# Altium PCB TYPE-C 16PIN 2MD(073).pcbdoc
Units mm, origin at the board's own origin, x right, y up, seen from the top; angles counter-clockwise.
Board outline 22.65 x 20.63 mm, 2 copper layers (Top Layer, Bottom Layer), stack 0.07 mm thick; 1 components, 0 nets, 16 pads, 0 vias.
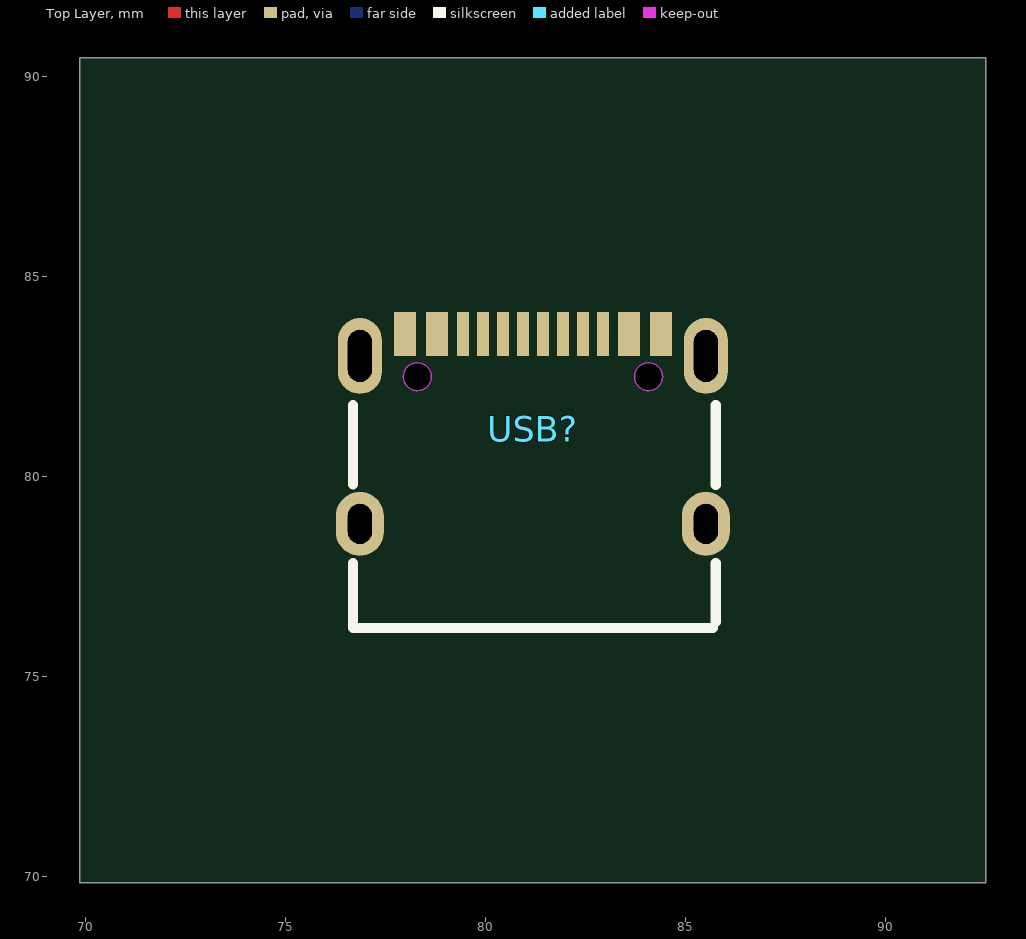
[diagram p0: Top Layer view]
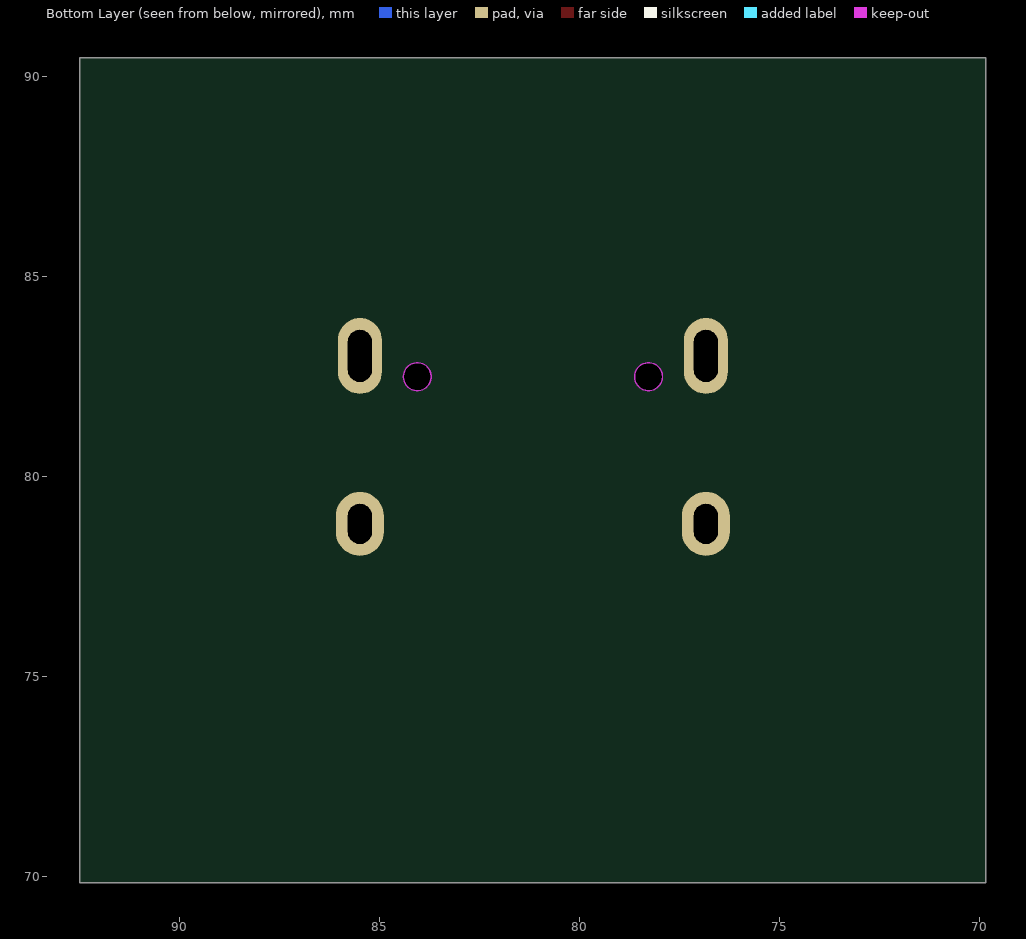
[diagram p1: Bottom Layer view, seen from below]

## Layer stack, top to bottom
Top Solder Mask Layer: solder mask 0.01, Dk 3.3
Top Layer: signal copper 0.035
Bottom Layer: signal copper 0.035
Bottom Solder Mask Layer: solder mask 0.01, Dk 3.3

## Board outline
92.5,69.85 69.85,69.85 69.85,90.476 92.5,90.476

## Components (designator, comment, footprint, x,y, rotation, side; value= is the part's Value field where it differs from the comment)
USB? "TYPE-C 16PIN 2MD(073)" USB-C-SMD_TYPE-C-16PIN-2MD-073 81.175,81.201 r0 top

## Footprints (in the part's own frame and the unit in brackets; to place one, negate y for a bottom-side part, rotate by r counter-clockwise, add the part's x,y. Pads: shape width x height; smd on the part's side, far side on the other; paste and mask are expansions set on the pad)
USB-C-SMD_TYPE-C-16PIN-2MD-073 [mm]
  oval 1.2x1.6 hole 0.6 slot 1 at 90 deg paste+0 mask+0.05: 13(-4.325,-2.375) 14(4.325,-2.375)
  oval 1.1x1.9 hole 0.6 slot 1.3 at 90 deg paste+0 mask+0.05: 13(-4.325,1.825) 14(4.325,1.825)
  rect 0.55x1.1 smd paste+0 mask+0.05: A1B12(-3.2,2.375) A4B9(-2.4,2.375) B1A12(3.2,2.375) B4A9(2.4,2.375)
  rect 0.3x1.1 smd paste+0 mask+0.05: A5(-1.25,2.375) A6(-0.25,2.375) A7(0.25,2.375) A8(1.25,2.375) B5(1.75,2.375) B6(0.75,2.375) B7(-0.75,2.375) B8(-1.75,2.375)
  Board Outline Layer circle w0.003: c-2.89,1.305 r0.35
  Board Outline Layer circle w0.003: c2.89,1.305 r0.35
  Board Outline Layer region: -2.54,1.305 -2.575,1.153 -2.672,1.031 -2.812,0.964 -2.968,0.964 -3.108,1.031 -3.205,1.153 -3.24,1.305 -3.24,1.305 -3.205,1.457 -3.108,1.579 -2.968,1.646 -2.812,1.646 -2.672,1.579 -2.575,1.457 -2.54,1.305
  Board Outline Layer region: -2.54,1.305 -2.549,1.227 -2.575,1.153 -2.616,1.087 -2.672,1.031 -2.738,0.99 -2.812,0.964 -2.89,0.955 -2.968,0.964 -3.042,0.99 -3.108,1.031 -3.164,1.087 -3.205,1.153 -3.231,1.227 -3.24,1.305 -3.231,1.383 -3.205,1.457 -3.164,1.523 -3.108,1.579 -3.042,1.62 -2.968,1.646 -2.89,1.655 -2.812,1.646 -2.738,1.62 -2.672,1.579 -2.616,1.523 -2.575,1.457 -2.549,1.383
  Board Outline Layer region: 3.24,1.305 3.205,1.153 3.108,1.031 2.968,0.964 2.812,0.964 2.672,1.031 2.575,1.153 2.54,1.305 2.54,1.305 2.575,1.457 2.672,1.579 2.812,1.646 2.968,1.646 3.108,1.579 3.205,1.457 3.24,1.305
  Board Outline Layer region: 3.24,1.305 3.231,1.227 3.205,1.153 3.164,1.087 3.108,1.031 3.042,0.99 2.968,0.964 2.89,0.955 2.812,0.964 2.738,0.99 2.672,1.031 2.616,1.087 2.575,1.153 2.549,1.227 2.54,1.305 2.549,1.383 2.575,1.457 2.616,1.523 2.672,1.579 2.738,1.62 2.812,1.646 2.89,1.655 2.968,1.646 3.042,1.62 3.108,1.579 3.164,1.523 3.205,1.457 3.231,1.383
  Multi-Layer board cut-out: -2.54,1.305 -2.575,1.153 -2.672,1.031 -2.812,0.964 -2.968,0.964 -3.108,1.031 -3.205,1.153 -3.24,1.305 -3.24,1.305 -3.205,1.457 -3.108,1.579 -2.968,1.646 -2.812,1.646 -2.672,1.579 -2.575,1.457 -2.54,1.305
  Multi-Layer board cut-out: 3.24,1.305 3.205,1.153 3.108,1.031 2.968,0.964 2.812,0.964 2.672,1.031 2.575,1.153 2.54,1.305 2.54,1.305 2.575,1.457 2.672,1.579 2.812,1.646 2.968,1.646 3.108,1.579 3.205,1.457 3.24,1.305
  silkscreen extent -4.5,-4.97 4.57,0.6

## Nets (pads, with @x,y where several pads share a name; then routed paths per layer and width w, separated by ;. In a path a pad name is that pad's centre, name@x,y a point inside that pad or via, vN(x,y) a via of type N, cw(c..) or ccw(c..) an arc to the next point about the centre after c; other vN are vias at no path point)
pads on no net: USB?.13 USB?.14 USB?.A1B12 USB?.A4B9 USB?.A5 USB?.A6 USB?.A7 USB?.A8 USB?.B1A12 USB?.B4A9 USB?.B5 USB?.B6 USB?.B7 USB?.B8